# Allegro board 887904-1112.brd
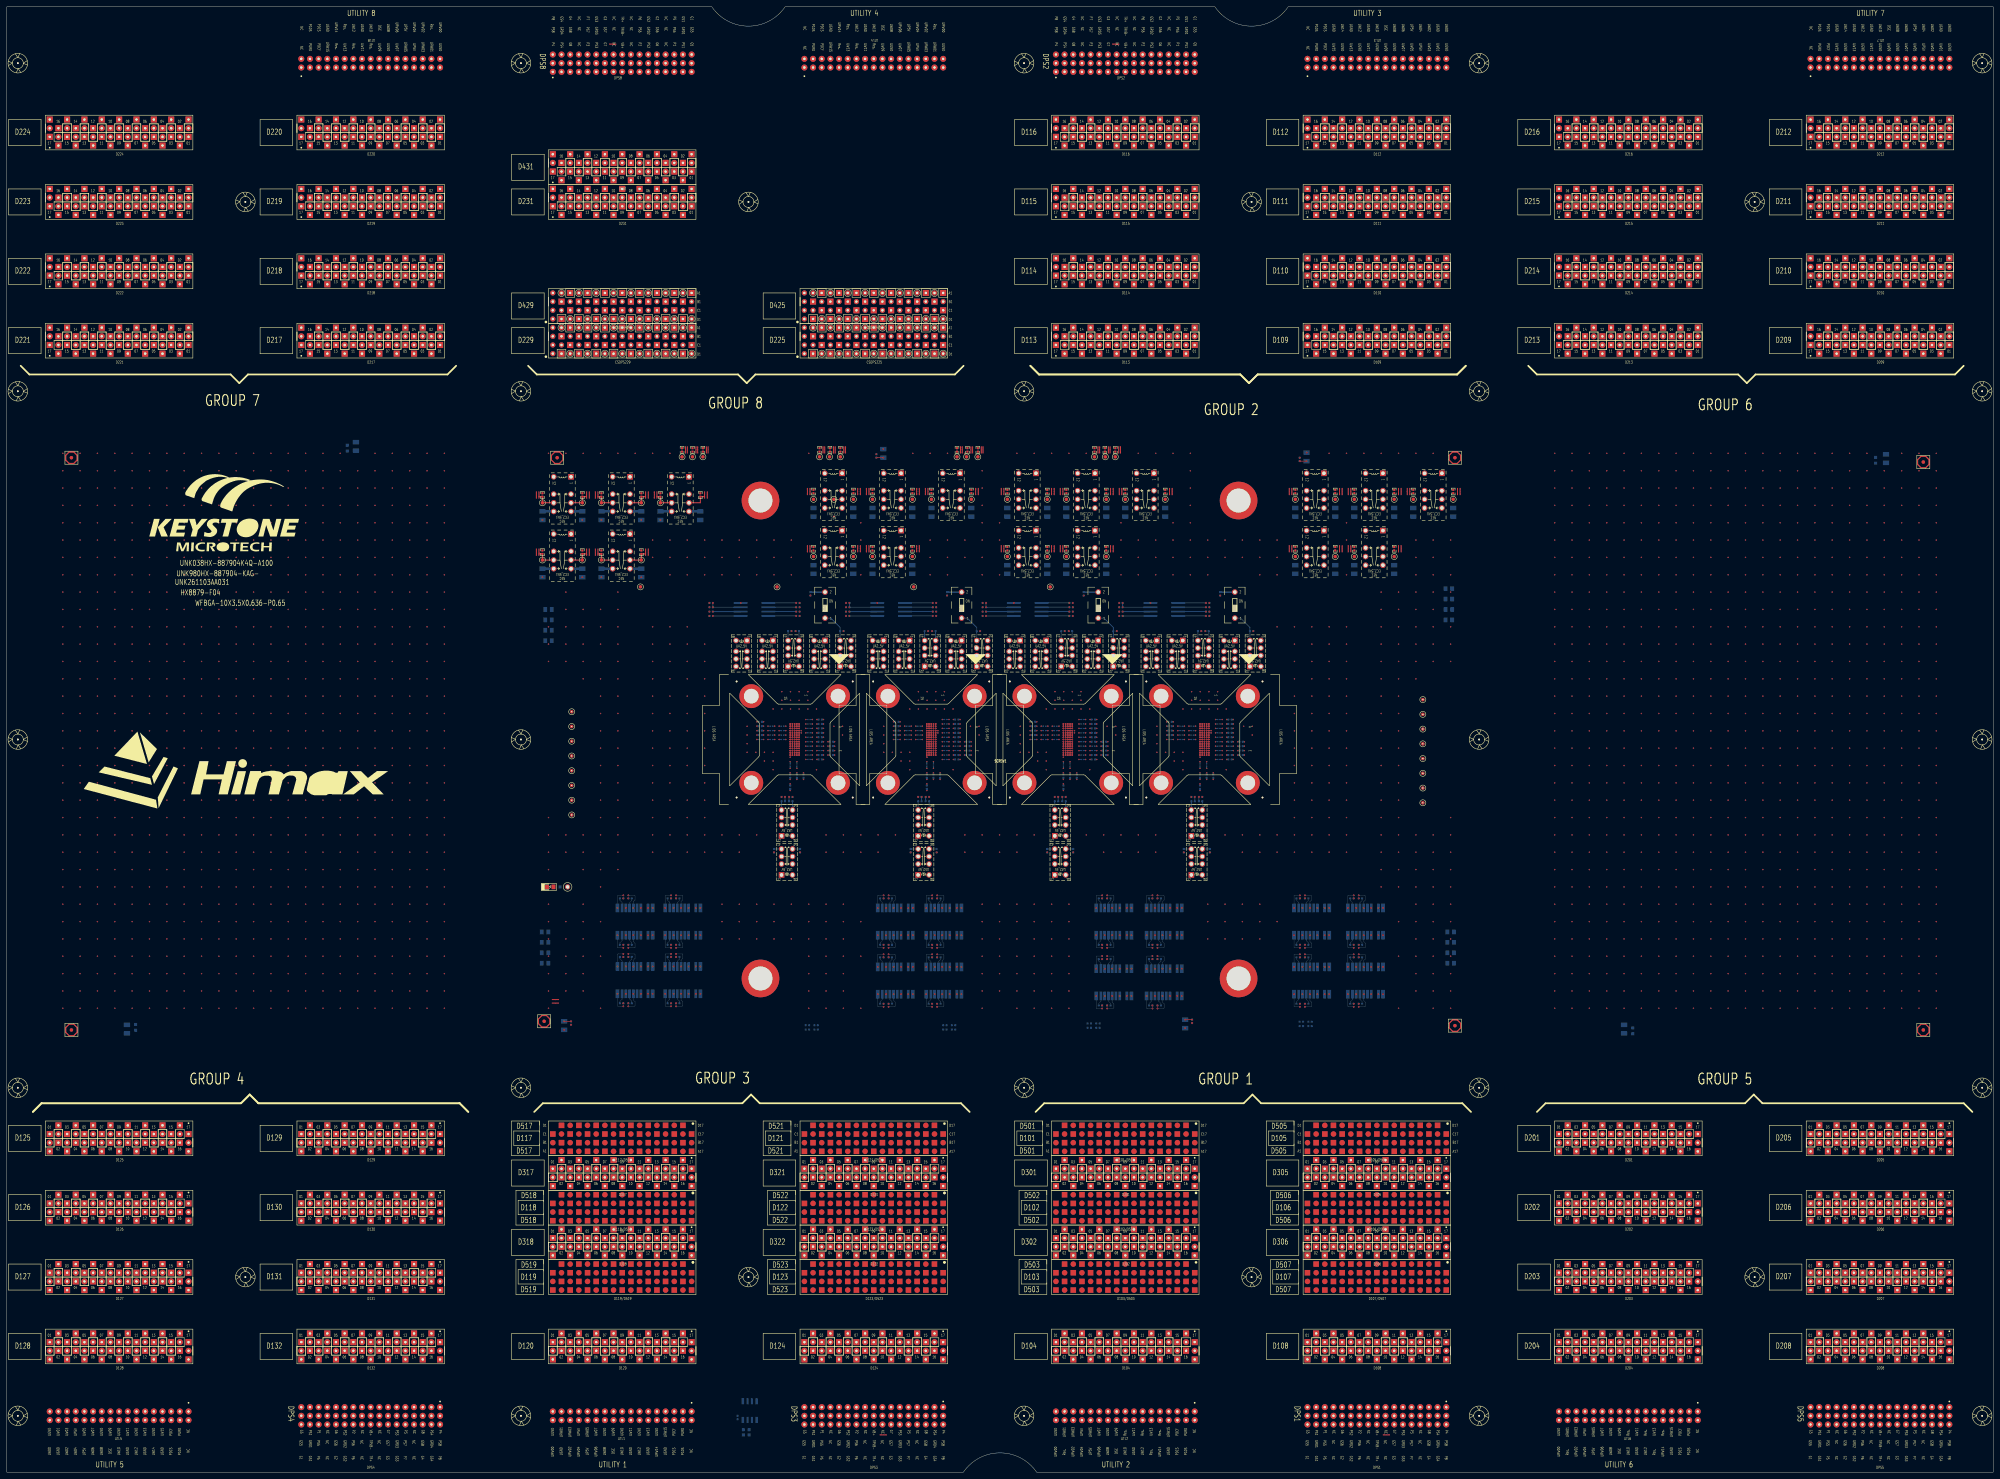
[diagram p0: board, top side]
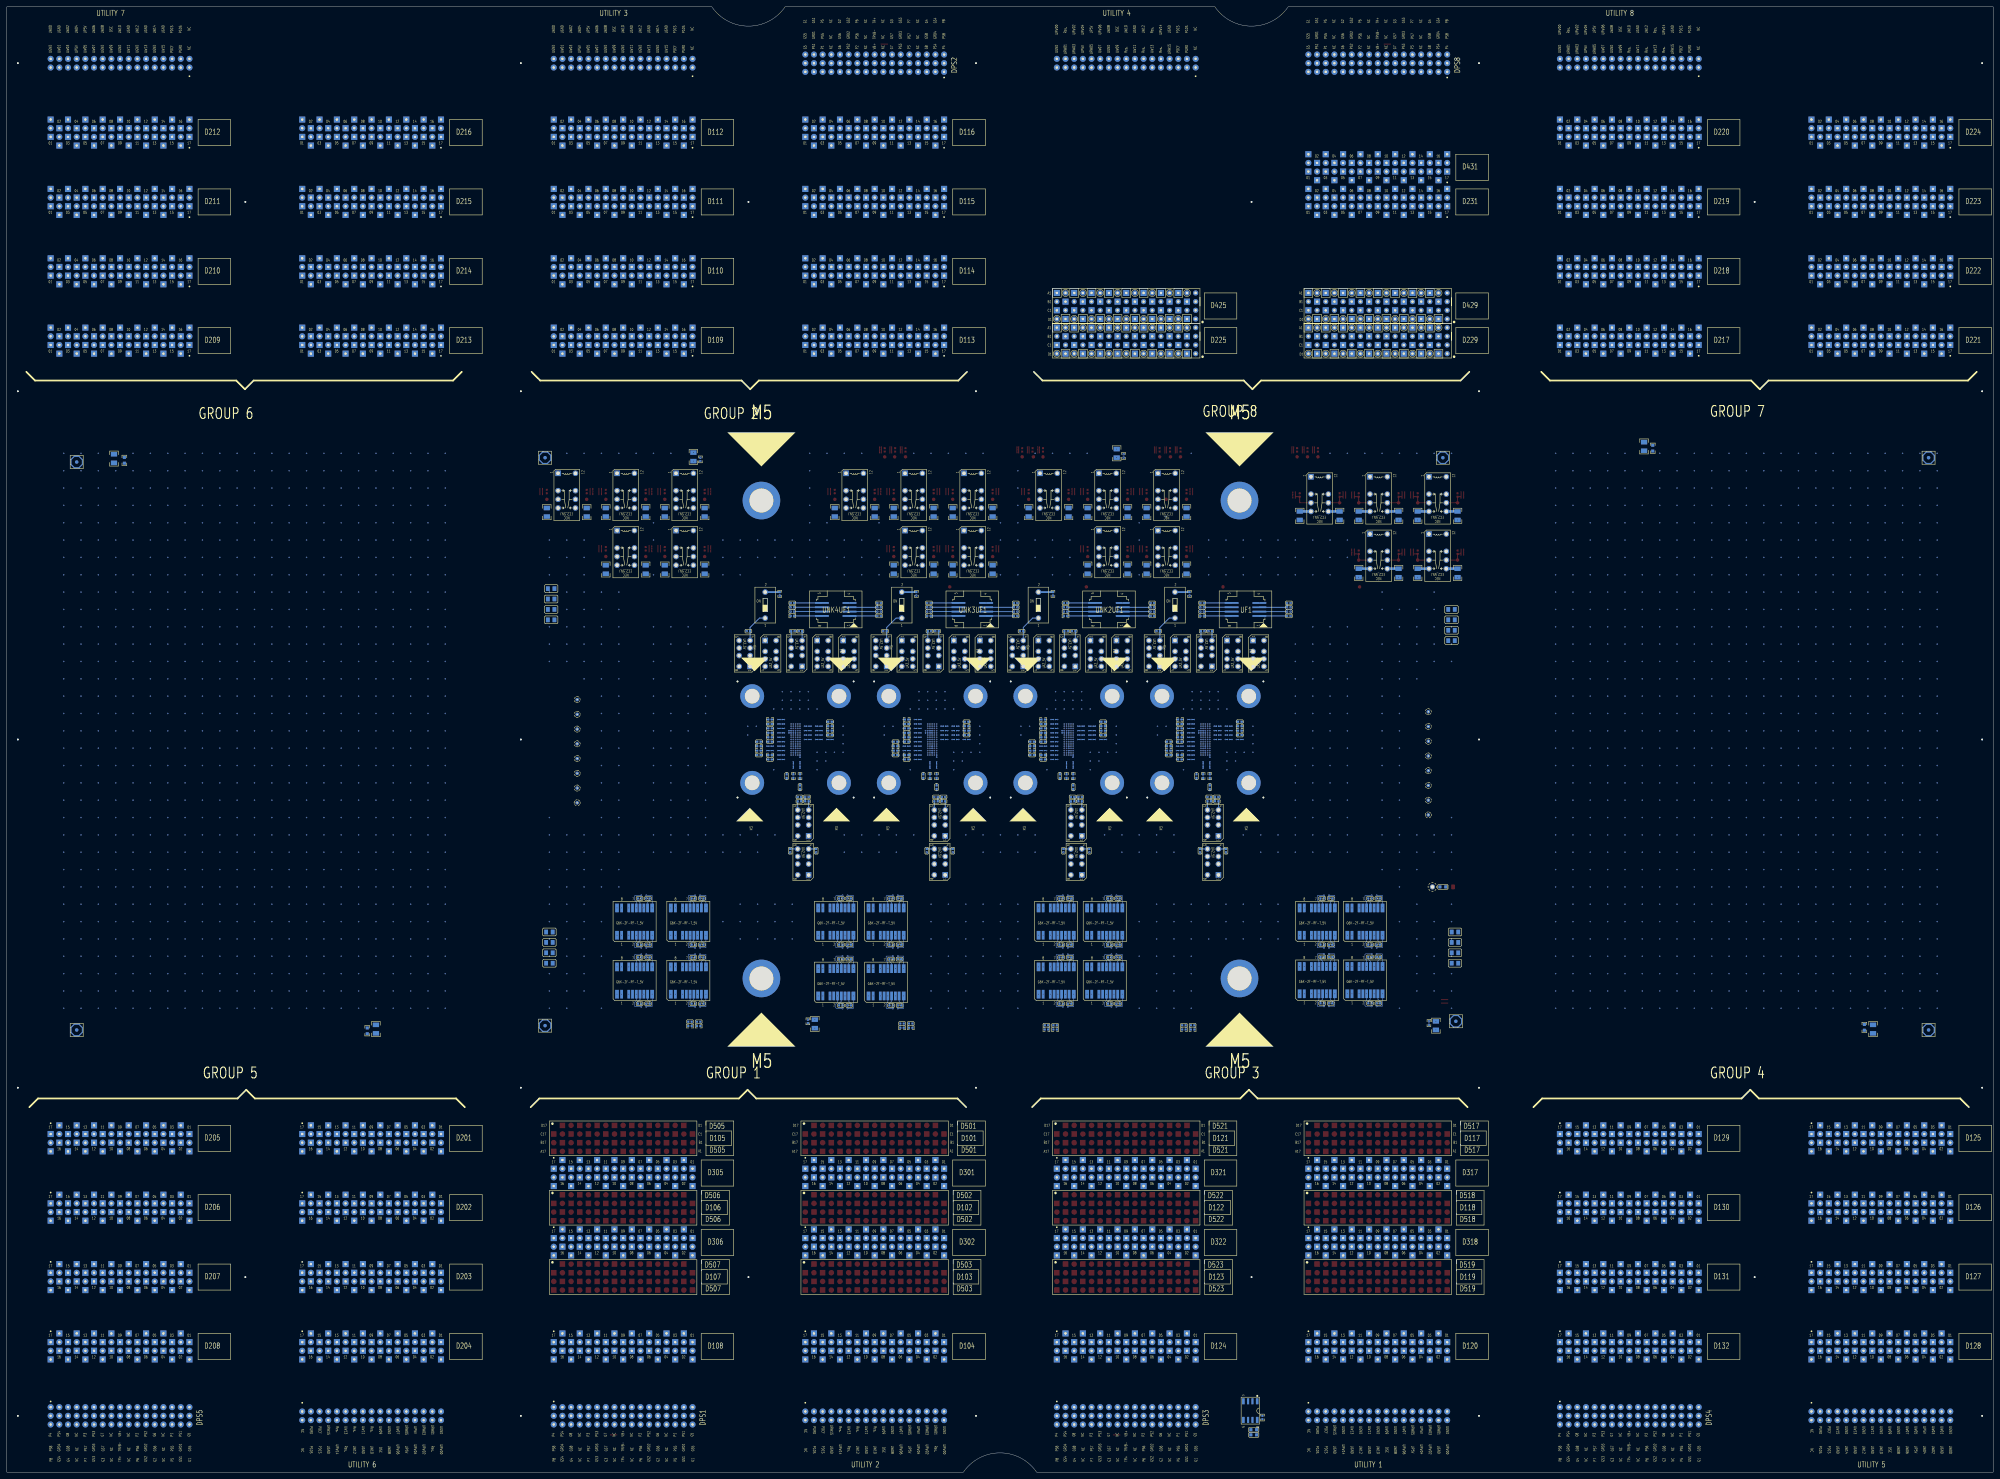
[diagram p1: board, bottom side, seen from below]

Outline 581.66 x 429.26 mm; copper layers: TOP, L02_GND, L03_SIGNAL, L04_GND, L05_SIGNAL, L06_GND, L07_SIGNAL, L08_GND, L09_POWER, L10_GND, L11_POWER, L12_GND, L13_POWER, L14_GND, L15_POWER, L16_GND, L17_POWER, L18_GND, L19_POWER, L20_GND, L21_POWER, L22_GND, L23_POWER, L24_GND, L25_5V, L26_CBIT, L27_GND, L28_SIGNAL, L29_GND, L30_SIGNAL, L31_GND, L32_SIGNAL, L33_GND, BOTTOM. Coordinates in mm from the lower left corner of the outline.

## Design rules (mm)
net group DIFFPAIR0: nets S1_AUX+ S1_AUX-

## Placement (name value [footprint] x y rotation side)
BD29  BD120-3A-S8  [FB0805]  157.6 149.1 180 bottom
BD30  BD120-3A-S8  [FB0805]  157.6 158.24 180 bottom
BD31  BD120-3A-S8  [FB0805]  157.6 155.19 180 bottom
BD32  BD120-3A-S8  [FB0805]  157.6 152.15 180 bottom
BD33  BD120-3A-S8  [FB0805]  422.78 158.24 180 bottom
BD34  BD120-3A-S8  [FB0805]  422.78 149.1 180 bottom
BD35  BD120-3A-S8  [FB0805]  422.78 152.15 180 bottom
BD36  BD120-3A-S8  [FB0805]  422.78 155.19 180 bottom
BD37  BD120-3A-S8  [FB0805]  158.62 252.73 180 bottom
BD38  BD120-3A-S8  [FB0805]  158.62 249.68 180 bottom
BD39  BD120-3A-S8  [FB0805]  158.62 246.63 180 bottom
BD40  BD120-3A-S8  [FB0805]  158.62 243.59 180 bottom
BD41  BD120-3A-S8  [FB0805]  422.27 249.68 180 bottom
BD42  BD120-3A-S8  [FB0805]  422.27 258.83 180 bottom
BD43  BD120-3A-S8  [FB0805]  422.27 255.78 180 bottom
BD44  BD120-3A-S8  [FB0805]  422.27 252.73 180 bottom
C1  0.1U-16-X-S4-MU  [C0402]  231.64 250.82 0 bottom
C53  0.1U-16-X-S4-MU  [C0402]  234.43 129.67 180 bottom
C54  0.1U-16-X-S4-MU  [C0402]  236.97 129.67 180 bottom
C55  0.1U-16-X-S4-MU  [C0402]  235.32 257.3 90 bottom
C67  1U-10-X-S4-MU  [C0402]  220.62 217.23 180 bottom
C69  10U-25-X7R-SA  [C1206]  168.52 263.42 270 bottom
C70  10U-25-X7R-SA  [C1206]  156.84 263.42 270 bottom
C71  1U-10-X-S4-MU  [C0402]  241.42 211.38 0 bottom
C73  1U-10-X-S4-MU  [C0402]  238.17 215.28 0 bottom
C75  1U-10-X-S4-MU  [C0402]  241.42 212.68 0 bottom
C77  1U-10-X-S4-MU  [C0402]  238.17 216.58 0 bottom
C79  1U-10-X-S4-MU  [C0402]  231.35 203.91 270 bottom
C81  1U-10-X-S4-MU  [C0402]  229.4 203.91 270 bottom
C83  1U-10-X-S4-MU  [C0402]  238.17 220.48 0 bottom
C85  1U-10-X-S4-MU  [C0402]  238.17 210.08 0 bottom
C87  1U-10-X-S4-MU  [C0402]  220.62 218.53 180 bottom
C89  10U-25-X7R-SA  [C1206]  185.79 280.18 270 bottom
C90  10U-25-X7R-SA  [C1206]  174.11 280.18 270 bottom
C91  10U-25-X7R-SA  [C1206]  203.07 280.18 270 bottom
C92  10U-25-X7R-SA  [C1206]  191.38 280.18 270 bottom
C93  10U-25-X7R-SA  [C1206]  168.52 280.18 270 bottom
C94  10U-25-X7R-SA  [C1206]  156.84 280.18 270 bottom
C95  10U-25-X7R-SA  [C1206]  185.79 263.42 270 bottom
C96  10U-25-X7R-SA  [C1206]  174.11 263.42 270 bottom
CA1  NC/2.2U-10-X-S4-MU  [C0402]  168.52 269.49 90 top
CA2  NC/2.2U-10-X-S4-MU  [C0402]  185.79 286.26 90 top
CA3  NC/2.2U-10-X-S4-MU  [C0402]  191.38 286.26 90 top
CA4  NC/2.2U-10-X-S4-MU  [C0402]  168.52 286.26 90 top
CA5  NC/2.2U-10-X-S4-MU  [C0402]  156.84 286.26 90 top
CA6  NC/2.2U-10-X-S4-MU  [C0402]  185.79 269.49 90 top
CA7  NC/2.2U-10-X-S4-MU  [C0402]  174.11 286.26 90 top
CA8  NC/2.2U-10-X-S4-MU  [C0402]  174.11 269.49 90 top
CA9  NC/2.2U-10-X-S4-MU  [C0402]  156.84 269.49 90 top
CA10  NC/2.2U-10-X-S4-MU  [C0402]  203.07 286.26 90 top
CA12  NC/2.2U-10-X-S4-MU  [C0402]  203.83 299.47 90 top
CA13  NC/2.2U-10-X-S4-MU  [C0402]  197.73 299.47 90 top
CA14  NC/2.2U-10-X-S4-MU  [C0402]  200.78 299.47 90 top
CB1  0.1U-16-X-S4-MU  [C0402]  165.22 131.56 270 bottom
CB2  10U-25-X7R-SA  [C1206]  163.19 130.81 90 bottom
CB3  0.1U-16-X-S4-MU  [C0402]  347.08 132.07 270 bottom
CB4  10U-25-X7R-SA  [C1206]  345.05 131.32 90 bottom
CB5  0.1U-16-X-S4-MU  [C0402]  378.58 296.68 90 bottom
CB6  10U-25-X7R-SA  [C1206]  380.61 297.43 270 bottom
CB7  0.1U-16-X-S4-MU  [C0402]  254.63 297.7 90 bottom
CB8  10U-25-X7R-SA  [C1206]  256.66 298.45 270 bottom
CB9  0.1U-25-X-S6  [C0603]  37.71 130.3 270 bottom
CB10  10U-25-X7R-SA  [C1206]  35.17 129.79 270 bottom
CB11  0.1U-25-X-S6  [C0603]  476.12 129.29 270 bottom
CB12  10U-25-X7R-SA  [C1206]  473.58 129.79 270 bottom
CB13  0.1U-25-X-S6  [C0603]  547.24 296.42 90 bottom
CB14  10U-25-X7R-SA  [C1206]  550.28 296.93 90 bottom
CB15  0.1U-25-X-S6  [C0603]  99.69 299.97 90 bottom
CB16  10U-25-X7R-SA  [C1206]  102.23 300.48 90 bottom
CB19  0.1U-16-X-S4-MU  [C0402]  213.99 16 90 bottom
CC1  0.47U-10-X6S-S2-TY  [C0201]  223.87 214.63 180 bottom
CC2  0.47U-10-X6S-S2-TY  [C0201]  223.87 215.93 180 bottom
CC3  0.47U-10-X6S-S2-TY  [C0201]  223.87 217.23 180 bottom
CC4  0.47U-10-X6S-S2-TY  [C0201]  220.62 214.63 180 bottom
CC5  0.47U-10-X6S-S2-TY  [C0201]  234.92 217.88 0 bottom
CC6  0.47U-10-X6S-S2-TY  [C0201]  238.17 211.38 0 bottom
CC7  0.47U-10-X6S-S2-TY  [C0201]  234.92 213.98 0 bottom
CC8  0.47U-10-X6S-S2-TY  [C0201]  234.92 215.28 0 bottom
CC9  0.47U-10-X6S-S2-TY  [C0201]  238.17 212.68 0 bottom
CC10  0.47U-10-X6S-S2-TY  [C0201]  234.92 216.58 0 bottom
CC11  0.47U-10-X6S-S2-TY  [C0201]  231.35 207.16 270 bottom
CC12  0.47U-10-X6S-S2-TY  [C0201]  229.4 207.16 270 bottom
CC13  0.47U-10-X6S-S2-TY  [C0201]  234.92 220.48 0 bottom
CC14  0.47U-10-X6S-S2-TY  [C0201]  234.92 208.78 0 bottom
CC15  0.47U-10-X6S-S2-TY  [C0201]  223.87 218.53 180 bottom
CD1  0.1U-10-X7R-S2-MU  [C0201]  227.12 215.93 180 bottom
CD2  0.1U-10-X7R-S2-MU  [C0201]  231.02 217.23 0 bottom
CD3  0.1U-10-X7R-S2-MU  [C0201]  227.12 217.23 180 bottom
CD4  0.1U-10-X7R-S2-MU  [C0201]  227.12 214.63 180 bottom
CD5  0.1U-10-X7R-S2-MU  [C0201]  230.7 212.35 270 bottom
CD6  0.1U-10-X7R-S2-MU  [C0201]  234.92 211.38 0 bottom
CD7  0.1U-10-X7R-S2-MU  [C0201]  231.02 216.58 0 bottom
CD8  0.1U-10-X7R-S2-MU  [C0201]  232.32 216.58 0 bottom
CD9  0.1U-10-X7R-S2-MU  [C0201]  234.92 212.68 0 bottom
CD10  0.1U-10-X7R-S2-MU  [C0201]  232.32 217.23 0 bottom
CD11  0.1U-10-X7R-S2-MU  [C0201]  230.7 211.06 90 bottom
CD12  0.1U-10-X7R-S2-MU  [C0201]  229.4 209.75 270 bottom
CD13  0.1U-10-X7R-S2-MU  [C0201]  234.92 219.18 0 bottom
CD14  0.1U-10-X7R-S2-MU  [C0201]  234.92 210.08 0 bottom
CD15  0.1U-10-X7R-S2-MU  [C0201]  227.12 218.53 180 bottom
CSDPS225  V93K_CSDPS_DPS32  [PG_VG93K_PF_DPS32_G8D225]  253.87 331.47 0 top
CSDPS229  V93K_CSDPS_DPS32  [PG_VG93K_PF_DPS32_G8D229]  180.21 331.47 0 top
CSDPS425  V93K_CSDPS_DPS32  [PG_VG93K_PF_DPS32_G8D425]  253.87 341.63 0 top
CSDPS429  V93K_CSDPS_DPS32  [PG_VG93K_PF_DPS32_G8D429]  180.21 341.63 0 top
D101/D501  V93K_PS1600 HD  [PG_VG93K_F_HSM_G1D101_501_ND]  327.53 97.79 0 top
D102/D502  V93K_PS1600 HD  [PG_VG93K_F_HSM_G1D102_502_ND]  327.53 77.47 0 top
D103/D503  V93K_PS1600 HD  [PG_VG93K_F_HSM_G1D103_503_ND]  327.53 57.15 0 top
D104  V93K_CH  [PG_VG93K_F_G1D104]  327.53 36.83 0 top
D105/D505  V93K_PS1600 HD  [PG_VG93K_F_HSM_G1D105_505_ND]  401.19 97.79 0 top
D106/D506  V93K_PS1600 HD  [PG_VG93K_F_HSM_G1D106_506_ND]  401.19 77.47 0 top
D107/D507  V93K_PS1600 HD  [PG_VG93K_F_HSM_G1D107_507_ND]  401.19 57.15 0 top
D108  V93K_CH  [PG_VG93K_F_G1D108]  401.19 36.83 0 top
D109  V93K_CH  [PG_VG93K_F_G2D109]  401.19 331.47 0 top
D110  V93K_CH  [PG_VG93K_F_G2D110]  401.19 351.79 0 top
D111  V93K_CH  [PG_VG93K_F_G2D111]  401.19 372.11 0 top
D112  V93K_CH  [PG_VG93K_F_G2D112]  401.19 392.43 0 top
D113  V93K_CH  [PG_VG93K_F_G2D113]  327.53 331.47 0 top
D114  V93K_CH  [PG_VG93K_F_G2D114]  327.53 351.79 0 top
D115  V93K_CH  [PG_VG93K_F_G2D115]  327.53 372.11 0 top
D116  V93K_CH  [PG_VG93K_F_G2D116]  327.53 392.43 0 top
D117/D517  V93K_PS1600 HD  [PG_VG93K_F_HSM_G3D117_517_ND]  180.21 97.79 0 top
D118/D518  V93K_PS1600 HD  [PG_VG93K_F_HSM_G3D118_518_ND]  180.21 77.47 0 top
D119/D519  V93K_PS1600 HD  [PG_VG93K_F_HSM_G3D119_519_ND]  180.21 57.15 0 top
D120  V93K_CH  [PG_VG93K_F_G3D120]  180.21 36.83 0 top
D121/D521  V93K_PS1600 HD  [PG_VG93K_F_HSM_G3D121_521_ND]  253.87 97.79 0 top
D122/D522  V93K_PS1600 HD  [PG_VG93K_F_HSM_G3D122_522_ND]  253.87 77.47 0 top
D123/D523  V93K_PS1600 HD  [PG_VG93K_F_HSM_G3D123_523_ND]  253.87 57.15 0 top
D124  V93K_CH  [PG_VG93K_F_G3D124]  253.87 36.83 0 top
D125  V93K_CH  [PG_VG93K_F_G4D125]  32.89 97.79 0 top
D126  V93K_CH  [PG_VG93K_F_G4D126]  32.89 77.47 0 top
D127  V93K_CH  [PG_VG93K_F_G4D127]  32.89 57.15 0 top
D128  V93K_CH  [PG_VG93K_F_G4D128]  32.89 36.83 0 top
D129  V93K_CH  [PG_VG93K_F_G4D129]  106.55 97.79 0 top
D130  V93K_CH  [PG_VG93K_F_G4D130]  106.55 77.47 0 top
D131  V93K_CH  [PG_VG93K_F_G4D131]  106.55 57.15 0 top
D132  V93K_CH  [PG_VG93K_F_G4D132]  106.55 36.83 0 top
D201  V93K_CH  [PG_VG93K_F_G5D201]  474.85 97.79 0 top
D202  V93K_CH  [PG_VG93K_F_G5D202]  474.85 77.47 0 top
D203  V93K_CH  [PG_VG93K_F_G5D203]  474.85 57.15 0 top
D204  V93K_CH  [PG_VG93K_F_G5D204]  474.85 36.83 0 top
D205  V93K_CH  [PG_VG93K_F_G5D205]  548.51 97.79 0 top
D206  V93K_CH  [PG_VG93K_F_G5D206]  548.51 77.47 0 top
D207  V93K_CH  [PG_VG93K_F_G5D207]  548.51 57.15 0 top
D208  V93K_CH  [PG_VG93K_F_G5D208]  548.51 36.83 0 top
D209  V93K_CH  [PG_VG93K_F_G6D209]  548.51 331.47 0 top
D210  V93K_CH  [PG_VG93K_F_G6D210]  548.51 351.79 0 top
D211  V93K_CH  [PG_VG93K_F_G6D211]  548.51 372.11 0 top
D212  V93K_CH  [PG_VG93K_F_G6D212]  548.51 392.43 0 top
D213  V93K_CH  [PG_VG93K_F_G6D213]  474.85 331.47 0 top
D214  V93K_CH  [PG_VG93K_F_G6D214]  474.85 351.79 0 top
D215  V93K_CH  [PG_VG93K_F_G6D215]  474.85 372.11 0 top
D216  V93K_CH  [PG_VG93K_F_G6D216]  474.85 392.43 0 top
D217  V93K_CH  [PG_VG93K_F_G7D217]  106.55 331.47 0 top
D218  V93K_CH  [PG_VG93K_F_G7D218]  106.55 351.79 0 top
D219  V93K_CH  [PG_VG93K_F_G7D219]  106.55 372.11 0 top
D220  V93K_CH  [PG_VG93K_F_G7D220]  106.55 392.43 0 top
D221  V93K_CH  [PG_VG93K_F_G7D221]  32.89 331.47 0 top
D222  V93K_CH  [PG_VG93K_F_G7D222]  32.89 351.79 0 top
D223  V93K_CH  [PG_VG93K_F_G7D223]  32.89 372.11 0 top
D224  V93K_CH  [PG_VG93K_F_G7D224]  32.89 392.43 0 top
D231  V93K_CH  [PG_VG93K_F_G8D231]  180.21 372.11 0 top
D301  V93K_CH  [PG_VG93K_F_G1D301]  327.53 87.63 0 top
D302  V93K_CH  [PG_VG93K_F_G1D302]  327.53 67.31 0 top
D305  V93K_CH  [PG_VG93K_F_G1D305]  401.19 87.63 0 top
D306  V93K_CH  [PG_VG93K_F_G1D306]  401.19 67.31 0 top
D317  V93K_CH  [PG_VG93K_F_G3D317]  180.21 87.63 0 top
D318  V93K_CH  [PG_VG93K_F_G3D318]  180.21 67.31 0 top
D321  V93K_CH  [PG_VG93K_F_G3D321]  253.87 87.63 0 top
D322  V93K_CH  [PG_VG93K_F_G3D322]  253.87 67.31 0 top
D431  V93K_CH  [PG_VG93K_F_G8D431]  180.21 382.27 0 top
DPS1  V93K_DPS  [PG_VG93K_F_G1DPS1]  401.19 16.51 0 top
DPS2  V93K_DPS  [PG_VG93K_F_G2DPS2]  327.53 412.75 0 top
DPS3  V93K_DPS  [PG_VG93K_F_G3DPS3]  253.87 16.51 0 top
DPS4  V93K_DPS  [PG_VG93K_F_G4DPS4]  106.55 16.51 0 top
DPS5  V93K_DPS  [PG_VG93K_F_G5DPS5]  548.51 16.51 0 top
DPS8  V93K_DPS  [PG_VG93K_F_G8DPS8]  180.21 412.75 0 top
FD1  -  [FD_040_V2]  157.35 132.08 0 top
FD2  -  [FD_040_V2]  424.05 130.81 0 top
FD3  -  [FD_040_V2]  424.05 297.18 0 top
FD4  -  [FD_040_V2]  161.16 297.18 0 top
FD5  -  [FD_040_V2]  18.92 129.54 0 top
FD6  -  [FD_040_V2]  561.21 129.54 0 top
FD7  -  [FD_040_V2]  561.21 295.91 0 top
FD8  -  [FD_040_V2]  18.92 297.18 0 top
FD9  -  [FD_040_V2]  157.35 132.08 180 bottom
FD10  -  [FD_040_V2]  424.05 130.81 180 bottom
FD11  -  [FD_040_V2]  424.05 297.18 180 bottom
FD12  -  [FD_040_V2]  161.16 297.18 180 bottom
FD13  -  [FD_040_V2]  18.92 129.54 180 bottom
FD14  -  [FD_040_V2]  561.21 129.54 180 bottom
FD15  -  [FD_040_V2]  561.21 295.91 180 bottom
FD16  -  [FD_040_V2]  18.92 297.18 180 bottom
GND1  TP01  [TP_040_T]  185.54 259.33 0 top
HX8879-F04  REF-CODE-CHIP  [CHIP_CODE]  56.51 257.81 0 top
K9  UA2-5NJ-A-V3  [RL_NECUA2_5V_V3]  228.47 189.99 270 bottom
K10  UA2-5NJ-A-V3  [RL_NECUA2_5V_V3]  245.61 239.63 270 bottom
K14  UA2-5NJ-A-V3  [RL_NECUA2_5V_V3]  215.13 240.03 90 bottom
K15  UA2-5NJ-A-V3  [RL_NECUA2_5V_V3]  222.75 240.03 90 bottom
K28  UA2-5NJ-A-V3  [RL_NECUA2_5V_V3]  230.37 239.63 270 bottom
K48  UA2-5NJ-A-V3  [RL_NECUA2_5V_V3]  237.99 240.03 90 bottom
K50  UA2-5NJ-A-V3  [RL_NECUA2_5V_V3]  228.47 178.56 270 bottom
K54  G6K-2F-RF-T-5V-SPECIAL  [RL_G6K2FRT_8P_5V_GR]  197.99 161.29 180 bottom
K55  EC2-5NJ-A  [RL_NECEC2_10P_5V]  162.68 268.48 90 bottom
K56  EC2-5NJ-A  [RL_NECEC2_10P_5V]  179.95 285.24 90 bottom
K57  EC2-5NJ-A  [RL_NECEC2_10P_5V]  197.22 285.24 90 bottom
K58  EC2-5NJ-A  [RL_NECEC2_10P_5V]  162.68 285.24 90 bottom
K59  EC2-5NJ-A  [RL_NECEC2_10P_5V]  179.95 268.48 90 bottom
K60  G6K-2F-RF-T-5V-SPECIAL  [RL_G6K2FRT_8P_5V_GR]  184.02 161.29 180 bottom
K61  G6K-2F-RF-T-5V-SPECIAL  [RL_G6K2FRT_8P_5V_GR]  184.02 144.14 180 bottom
K62  G6K-2F-RF-T-5V-SPECIAL  [RL_G6K2FRT_8P_5V_GR]  197.99 144.14 180 bottom
LDB1  LDB-2-S8  [LED_0805]  159.12 171.45 0 top
LOGO1  -  [LOGO_KT_KSMT]  60.57 274.07 0 top
LOGO2  LOGO_HX_Himax  [LOGO_HX_HIMAX]  65.65 200.41 0 top
LRB1  330-1-S6  [R0603]  161.16 171.45 180 bottom
NOREF  -  []  326.01 241.23 0 top
NOREF#2  -  []  275.52 213.66 90 top
NOREF#3  -  []  337.28 245.28 0 top
NOREF#4  -  []  392.68 140.02 90 top
NOREF#5  -  []  237.57 212.36 0 top
NOREF#6  -  []  333.74 256.53 0 top
NOREF#7  -  []  319.59 250.2 90 top
NOREF#8  -  []  475.67 130.14 0 top
NOREF#9  -  []  354.32 220.16 0 top
NOREF#10  -  []  304.35 243.63 0 top
NOREF#11  -  []  266.52 216.25 0 top
NOREF#12  -  []  278.77 212.36 90 top
NOREF#13  -  []  314.99 245.28 0 top
NOREF#14  -  []  197.44 140.15 0 top
NOREF#15  -  []  354.32 209.76 0 top
NOREF#16  -  []  239.59 243.63 0 top
NOREF#17  -  []  277.07 257.31 0 top
NOREF#18  -  []  300.95 241.63 0 top
NOREF#19  -  []  184.57 165.29 0 top
NOREF#20  -  []  237.07 257.31 0 top
NOREF#21  -  []  274.32 212.36 0 top
NOREF#22  -  []  266.67 191.59 0 top
NOREF#23  -  []  359.59 236.03 0 top
NOREF#24  -  []  236.59 248.76 90 top
NOREF#25  -  []  376.94 140.02 90 top
NOREF#26  -  []  322.61 245.28 0 top
NOREF#27  -  []  306.32 184.74 0 top
NOREF#28  -  []  177.67 167.19 0 top
NOREF#29  -  []  260.7 217.09 90 top
NOREF#30  -  []  339.51 165.29 0 top
NOREF#31  -  []  233.97 238.03 90 top
NOREF#32  -  []  317.87 149.41 0 top
NOREF#33  -  []  346.64 247.33 90 top
NOREF#34  -  []  203.61 139.69 90 top
NOREF#35  -  []  226.37 241.23 0 top
NOREF#36  -  []  201.74 157.29 0 top
NOREF#37  -  []  397.33 157.29 0 top
NOREF#38  -  []  306.52 218.21 90 top
NOREF#39  -  []  182.37 148.14 0 top
NOREF#40  -  []  310.7 210.76 90 top
NOREF#41  -  []  315.52 220.16 90 top
NOREF#42  -  []  333.76 139.51 90 top
NOREF#43  -  []  288.7 233.63 0 top
NOREF#44  -  []  313.97 238.03 90 top
NOREF#45  -  []  234.62 215.28 0 top
NOREF#46  -  []  197.44 157.29 0 top
NOREF#47  -  []  233.99 241.63 0 top
NOREF#48  -  []  331.13 241.63 0 top
NOREF#49  -  []  251.7 233.63 0 top
NOREF#50  -  []  317.87 211.38 0 top
NOREF#51  -  []  234.32 213.66 0 top
NOREF#52  -  []  311.14 196.91 90 top
NOREF#53  -  []  347.37 245.28 0 top
NOREF#54  -  []  300.02 214.95 0 top
NOREF#55  -  []  235.52 208.46 90 top
NOREF#56  -  []  300.32 214.63 0 top
NOREF#57  -  []  346.52 218.85 0 top
NOREF#58  -  []  273.89 140.02 0 top
NOREF#59  -  []  226.82 215.93 0 top
NOREF#60  -  []  316.59 259.26 0 top
NOREF#61  -  []  258.75 241.63 0 top
NOREF#62  -  []  367.7 197.63 90 top
NOREF#63  -  []  234.32 208.46 0 top
NOREF#64  -  []  224.47 191.59 0 top
NOREF#65  -  []  283.4 201.93 90 top
NOREF#66  -  []  211.13 241.63 0 top
NOREF#67  -  []  262.99 250.83 90 top
NOREF#68  -  []  264.47 191.59 0 top
NOREF#69  -  []  216.73 236.03 0 top
NOREF#70  -  []  303.57 215.93 0 top
NOREF#71  -  []  231.62 216.26 90 top
NOREF#72  -  []  218.73 238.43 90 top
NOREF#73  -  []  274.32 218.86 0 top
NOREF#74  -  []  269.08 209.16 90 top
NOREF#75  -  []  223.27 215.61 90 top
NOREF#76  -  []  352 210.08 90 top
NOREF#77  -  []  362.61 234.38 0 top
NOREF#78  -  []  275.52 208.46 90 top
NOREF#79  -  []  312.07 176.96 90 top
NOREF#80  -  []  255.02 157.29 90 top
NOREF#81  -  []  322.57 165.29 0 top
NOREF#82  -  []  247.7 197.63 90 top
NOREF#83  -  []  296.73 236.03 0 top
NOREF#84  -  []  305.47 173.31 0 top
NOREF#85  -  []  386.24 157.34 90 top
NOREF#86  -  []  316.59 248.76 90 top
NOREF#87  -  []  223.57 215.93 0 top
NOREF#88  -  []  298 227.33 0 top
NOREF#89  -  []  354.32 213.66 0 top
NOREF#90  -  []  357.07 250.71 90 top
NOREF#91  -  []  251.7 228.68 45 top
NOREF#92  -  []  270.59 165.29 0 top
NOREF#93  -  []  398.43 148.02 0 top
NOREF#94  -  []  192.34 158.56 90 top
NOREF#95  -  []  229.4 219.18 0 top
NOREF#96  -  []  274.62 208.78 0 top
NOREF#97  -  []  191.64 150.04 0 top
NOREF#98  -  []  273.97 238.03 90 top
NOREF#99  -  []  234.62 211.38 0 top
NOREF#100  -  []  249.21 238.03 90 top
NOREF#101  -  []  314.32 213.66 0 top
NOREF#102  -  []  266.32 184.74 0 top
NOREF#103  -  []  360.14 245.28 0 top
NOREF#104  -  []  226.32 173.31 0 top
NOREF#105  -  []  269.08 209.16 0 top
NOREF#106  -  []  397.33 140.02 0 top
NOREF#107  -  []  269.66 140.57 90 top
NOREF#108  -  []  223.27 214.95 0 top
NOREF#109  -  []  226.52 218.85 0 top
NOREF#110  -  []  346.32 173.31 0 top
NOREF#111  -  []  343.06 157.34 90 top
NOREF#112  -  []  303.27 216.25 0 top
NOREF#113  -  []  317.57 211.06 0 top
NOREF#114  -  []  271.03 206.56 0 top
NOREF#115  -  []  398.43 148.02 0 top
NOREF#116  -  []  333.76 165.29 0 top
NOREF#117  -  []  256.37 165.29 0 top
NOREF#118  -  []  352.92 216.91 90 top
NOREF#119  -  []  178.82 140.15 90 top
NOREF#120  -  []  392.68 165.29 0 top
NOREF#121  -  []  192.79 140.15 90 top
NOREF#122  -  []  306.32 173.31 0 top
NOREF#123  -  []  361.61 241.23 0 top
NOREF#124  -  []  281.59 238.43 90 top
NOREF#125  -  []  319.02 165.29 0 top
NOREF#126  -  []  354.62 220.48 0 top
NOREF#127  -  []  293.33 241.63 0 top
NOREF#128  -  []  311.72 216.26 0 top
NOREF#129  -  []  315.52 208.46 90 top
NOREF#130  -  []  358.77 212.36 90 top
NOREF#131  -  []  253.87 167.19 0 top
NOREF#132  -  []  336.21 157.29 0 top
NOREF#133  -  []  304.64 249.73 90 top
NOREF#134  -  []  274.99 245.28 0 top
NOREF#135  -  []  354.32 217.56 0 top
NOREF#136  -  []  252.7 195.63 90 top
NOREF#137  -  []  323.81 241.23 0 top
NOREF#138  -  []  158.02 172.18 0 top
NOREF#139  -  []  310.38 211.66 0 top
NOREF#140  -  []  310.7 212.05 90 top
NOREF#141  -  []  211.7 228.68 45 top
NOREF#142  -  []  203.7 204.63 90 top
NOREF#143  -  []  202.09 157.34 90 top
NOREF#144  -  []  268.87 191.59 0 top
NOREF#145  -  []  264.47 180.16 0 top
NOREF#146  -  []  354.62 216.58 0 top
NOREF#147  -  []  315.52 213.66 90 top
NOREF#148  -  []  271.69 140.02 0 top
NOREF#149  -  []  259.67 157.29 0 top
NOREF#150  -  []  143.7 321.13 0 top
NOREF#151  -  []  229.4 206.86 90 top
NOREF#152  -  []  412.53 273.64 0 top
NOREF#153  -  []  234.32 216.26 0 top
NOREF#154  -  []  234.32 211.06 0 top
NOREF#155  -  []  317.07 250.71 90 top
NOREF#156  -  []  321.47 157.29 0 top
NOREF#157  -  []  355.52 220.16 90 top
NOREF#158  -  []  241.59 238.43 90 top
NOREF#159  -  []  269.4 219.18 0 top
NOREF#160  -  []  315.52 209.76 90 top
NOREF#161  -  []  315.72 204.55 0 top
NOREF#162  -  []  403.51 156.84 90 top
NOREF#163  -  []  234.32 214.96 0 top
NOREF#164  -  []  312.92 216.26 90 top
NOREF#165  -  []  223.27 218.21 90 top
NOREF#166  -  []  179.24 157.84 90 top
NOREF#167  -  []  243.7 204.63 90 top
NOREF#168  -  []  182.37 165.29 0 top
NOREF#169  -  []  232.02 217.23 0 top
NOREF#170  -  []  280.06 139.57 90 top
NOREF#171  -  []  277.57 212.36 0 top
NOREF#172  -  []  272.07 188.39 90 top
NOREF#173  -  []  236.59 259.26 0 top
NOREF#174  -  []  291.13 241.63 0 top
NOREF#175  -  []  240.14 245.28 0 top
NOREF#176  -  []  267.37 245.28 0 top
NOREF#177  -  []  264.14 248.93 90 top
NOREF#178  -  []  160.92 170.45 90 top
NOREF#179  -  []  293.24 255.73 0 top
NOREF#180  -  []  234.32 212.36 0 top
NOREF#181  -  []  333.31 140.78 90 top
NOREF#182  -  []  223.27 217.55 0 top
NOREF#183  -  []  306.67 191.59 0 top
NOREF#184  -  []  269.08 206.56 0 top
NOREF#185  -  []  343.27 218.21 90 top
NOREF#186  -  []  260.77 148.02 0 top
NOREF#187  -  []  309.08 209.16 0 top
NOREF#188  -  []  263.57 215.93 0 top
NOREF#189  -  []  226.52 218.21 90 top
NOREF#190  -  []  257.47 157.29 0 top
NOREF#191  -  []  324.77 147.51 0 top
NOREF#192  -  []  274.62 213.98 0 top
NOREF#193  -  []  354.32 216.26 0 top
NOREF#194  -  []  343.27 216.91 90 top
NOREF#195  -  []  366.01 241.23 0 top
NOREF#196  -  []  258.73 238.43 90 top
NOREF#197  -  []  357.57 212.36 0 top
NOREF#198  -  []  318.77 212.36 90 top
NOREF#199  -  []  268.79 141.29 90 top
NOREF#200  -  []  354.62 211.38 0 top
NOREF#201  -  []  345.47 195.64 0 top
NOREF#202  -  []  278.39 241.63 0 top
NOREF#203  -  []  314.32 216.26 0 top
NOREF#204  -  []  269.4 209.46 90 top
NOREF#205  -  []  346.67 180.16 0 top
NOREF#206  -  []  401.63 140.02 0 top
NOREF#207  -  []  283.7 224.63 0 top
NOREF#208  -  []  258.75 241.63 0 top
NOREF#209  -  []  322.57 147.51 0 top
NOREF#210  -  []  328.32 157.34 90 top
NOREF#211  -  []  274.99 165.29 0 top
NOREF#212  -  []  181.27 157.29 0 top
NOREF#213  -  []  232 210.08 90 top
NOREF#214  -  []  272.02 217.23 0 top
NOREF#215  -  []  260.02 214.31 90 top
NOREF#216  -  []  310.72 216.58 0 top
NOREF#217  -  []  226.52 217.55 0 top
NOREF#218  -  []  332.61 137.61 90 top
NOREF#219  -  []  323.4 201.93 90 top
NOREF#220  -  []  274.62 210.08 0 top
NOREF#221  -  []  253.87 138.12 90 top
NOREF#222  -  []  232.07 188.39 90 top
NOREF#223  -  []  355.52 214.96 90 top
NOREF#224  -  []  334.89 250.82 90 top
NOREF#225  -  []  272.02 216.58 0 top
NOREF#226  -  []  348.87 180.16 0 top
NOREF#227  -  []  349.08 209.16 0 top
NOREF#228  -  []  198.54 165.29 0 top
NOREF#229  -  []  329.21 238.03 90 top
NOREF#230  -  []  277.07 250.71 90 top
NOREF#231  -  []  224.64 249.73 90 top
NOREF#232  -  []  178.82 165.29 0 top
NOREF#233  -  []  225.47 195.64 0 top
NOREF#234  -  []  347.37 234.38 0 top
NOREF#235  -  []  229.08 209.16 90 top
NOREF#236  -  []  303.27 218.21 90 top
NOREF#237  -  []  303.57 218.53 0 top
NOREF#238  -  []  271.02 210.46 90 top
NOREF#239  -  []  234.62 210.08 0 top
NOREF#240  -  []  318.58 140.78 90 top
NOREF#241  -  []  242.61 245.28 0 top
NOREF#242  -  []  361.61 241.23 0 top
NOREF#243  -  []  266.52 216.91 90 top
NOREF#244  -  []  271.72 216.26 0 top
NOREF#245  -  []  357.57 211.06 0 top
NOREF#246  -  []  313.99 241.63 0 top
NOREF#247  -  []  274.32 214.96 0 top
NOREF#248  -  []  274.32 209.76 0 top
NOREF#249  -  []  253.24 255.73 0 top
NOREF#250  -  []  377.36 140.57 90 top
NOREF#251  -  []  268.22 234.38 0 top
NOREF#252  -  []  306.52 218.85 0 top
NOREF#253  -  []  304.9 245.28 0 top
NOREF#254  -  []  311.02 210.46 90 top
NOREF#255  -  []  303.57 214.63 0 top
NOREF#256  -  []  275.52 218.86 90 top
NOREF#257  -  []  346.52 216.25 0 top
NOREF#258  -  []  323.7 224.63 0 top
NOREF#259  -  []  241.61 241.23 0 top
NOREF#260  -  []  351.62 216.91 90 top
NOREF#261  -  []  298.73 238.43 90 top
NOREF#262  -  []  322.61 245.28 0 top
NOREF#263  -  []  227.37 234.38 0 top
NOREF#264  -  []  235.52 214.96 90 top
NOREF#265  -  []  220.02 214.95 0 top
NOREF#266  -  []  291.13 241.63 0 top
NOREF#267  -  []  319.02 139.51 90 top
NOREF#268  -  []  220.02 214.31 90 top
NOREF#269  -  []  259.75 245.28 0 top
NOREF#270  -  []  345.47 184.21 0 top
NOREF#271  -  []  272.79 148.02 0 top
NOREF#272  -  []  235.52 211.06 90 top
NOREF#273  -  []  231.35 206.86 90 top
NOREF#274  -  []  231.03 206.56 90 top
NOREF#275  -  []  234.99 245.28 0 top
NOREF#276  -  []  271.72 216.91 0 top
NOREF#277  -  []  223.57 218.53 0 top
NOREF#278  -  []  271.62 216.26 90 top
NOREF#279  -  []  343.27 214.31 90 top
NOREF#280  -  []  263.57 214.63 0 top
NOREF#281  -  []  350.38 211.66 0 top
NOREF#282  -  []  256.37 148.02 0 top
NOREF#283  -  []  257.28 245.28 0 top
NOREF#284  -  []  346.37 241.23 0 top
NOREF#285  -  []  380.49 165.29 0 top
NOREF#286  -  []  314.62 219.18 0 top
NOREF#287  -  []  391.53 155.39 90 top
NOREF#288  -  []  303.57 217.23 0 top
NOREF#289  -  []  260.77 165.29 0 top
NOREF#290  -  []  280.14 245.28 0 top
NOREF#291  -  []  192.34 141.42 90 top
NOREF#292  -  []  223.57 217.23 0 top
NOREF#293  -  []  349.4 206.86 90 top
NOREF#294  -  []  345.47 184.74 0 top
NOREF#295  -  []  266.37 241.23 0 top
NOREF#296  -  []  303.27 218.85 0 top
NOREF#297  -  []  292.7 195.63 90 top
NOREF#298  -  []  275.52 214.96 90 top
NOREF#299  -  []  269.24 148.02 0 top
NOREF#300  -  []  178.37 158.56 90 top
NOREF#301  -  []  347.37 245.28 0 top
NOREF#302  -  []  263.57 218.53 0 top
NOREF#303  -  []  226.82 214.63 0 top
NOREF#304  -  []  348.87 191.59 0 top
NOREF#305  -  []  232.02 216.58 0 top
NOREF#306  -  []  311.62 216.26 90 top
NOREF#307  -  []  286.01 241.23 0 top
NOREF#308  -  []  354.62 219.18 0 top
NOREF#309  -  []  234.62 220.48 0 top
NOREF#310  -  []  314.62 216.58 0 top
NOREF#311  -  []  300.02 214.31 90 top
NOREF#312  -  []  270.72 216.58 0 top
NOREF#313  -  []  255.02 148.02 0 top
NOREF#314  -  []  291.7 228.68 45 top
NOREF#315  -  []  344.35 243.63 0 top
NOREF#316  -  []  342.71 139.51 0 top
NOREF#317  -  []  319.02 147.51 0 top
NOREF#318  -  []  99.24 299.12 0 top
NOREF#319  -  []  333.7 231.63 0 top
NOREF#320  -  []  260.77 148.02 0 top
NOREF#321  -  []  306.64 247.33 90 top
NOREF#322  -  []  211.7 233.63 0 top
NOREF#323  -  []  431.7 114.13 90 top
NOREF#324  -  []  354.32 212.36 0 top
NOREF#325  -  []  228.87 180.16 0 top
NOREF#326  -  []  355.52 212.36 90 top
NOREF#327  -  []  188.12 157.34 90 top
NOREF#328  -  []  339.75 245.28 0 top
NOREF#329  -  []  315.52 216.26 90 top
NOREF#330  -  []  398.43 165.29 0 top
NOREF#331  -  []  307.37 234.38 0 top
NOREF#332  -  []  351.62 216.26 90 top
NOREF#333  -  []  293.74 256.53 0 top
NOREF#334  -  []  304.47 180.16 0 top
NOREF#335  -  []  343.57 214.63 0 top
NOREF#336  -  []  264.32 157.34 90 top
NOREF#337  -  []  266.32 173.31 0 top
NOREF#338  -  []  303.27 214.95 0 top
NOREF#339  -  []  251.24 258.13 0 top
NOREF#340  -  []  323.67 157.29 0 top
NOREF#341  -  []  317.87 155.39 90 top
NOREF#342  -  []  270.77 241.23 0 top
NOREF#343  -  []  192.79 165.29 0 top
NOREF#344  -  []  272 210.08 90 top
NOREF#345  -  []  335.11 147.51 0 top
NOREF#346  -  []  332.61 149.41 0 top
NOREF#347  -  []  376.49 141.29 90 top
NOREF#348  -  []  346.32 184.74 0 top
NOREF#349  -  []  212.13 245.28 0 top
NOREF#350  -  []  336.21 139.51 0 top
NOREF#351  -  []  308.87 180.16 0 top
NOREF#352  -  []  263.15 241.63 0 top
NOREF#353  -  []  237.87 211.38 0 top
NOREF#354  -  []  243.7 224.63 0 top
NOREF#355  -  []  346.82 217.23 0 top
NOREF#356  -  []  320.37 165.29 0 top
NOREF#357  -  []  279.59 250.2 90 top
NOREF#358  -  []  319.02 157.29 90 top
NOREF#359  -  []  376.94 148.02 0 top
NOREF#360  -  []  257.47 140.02 0 top
NOREF#361  -  []  264.47 191.59 0 top
NOREF#362  -  []  237.57 211.06 0 top
NOREF#363  -  []  156.49 172.45 0 top
NOREF#364  -  []  314.32 217.56 0 top
NOREF#365  -  []  394.03 148.02 0 top
NOREF#366  -  []  265.47 184.21 0 top
NOREF#367  -  []  312.07 188.39 90 top
NOREF#368  -  []  329.85 139.06 90 top
NOREF#369  -  []  274.62 217.88 0 top
NOREF#370  -  []  265.47 184.21 0 top
NOREF#371  -  []  362.61 245.28 0 top
NOREF#372  -  []  380.49 148.02 0 top
NOREF#373  -  []  328.32 139.56 90 top
NOREF#374  -  []  308.57 241.23 0 top
NOREF#375  -  []  345.47 184.21 0 top
NOREF#376  -  []  307.37 245.28 0 top
NOREF#377  -  []  239.59 236.03 0 top
NOREF#378  -  []  310.38 211.75 0 top
NOREF#379  -  []  225.47 173.31 0 top
NOREF#380  -  []  348.57 241.23 0 top
NOREF#381  -  []  339.51 147.51 0 top
NOREF#382  -  []  211.24 258.13 0 top
NOREF#383  -  []  332.13 245.28 0 top
NOREF#384  -  []  314.62 212.68 0 top
NOREF#385  -  []  306.37 241.23 0 top
NOREF#386  -  []  265.47 195.64 0 top
NOREF#387  -  []  324.77 165.29 0 top
NOREF#388  -  []  278.19 157.29 0 top
NOREF#389  -  []  345.47 195.64 0 top
NOREF#390  -  []  223.57 214.63 0 top
NOREF#391  -  []  298.75 241.63 0 top
NOREF#392  -  []  352.07 176.96 90 top
NOREF#393  -  []  312.02 216.58 0 top
NOREF#394  -  []  312.92 216.91 90 top
NOREF#395  -  []  214.89 250.82 90 top
NOREF#396  -  []  218.75 241.63 0 top
NOREF#397  -  []  338.73 238.43 90 top
NOREF#398  -  []  194.14 148.14 0 top
NOREF#399  -  []  226.64 247.33 90 top
NOREF#400  -  []  231.72 216.26 0 top
NOREF#401  -  []  348.2 279.63 90 top
NOREF#402  -  []  276.59 259.26 0 top
NOREF#403  -  []  234.32 217.56 0 top
NOREF#404  -  []  263.27 217.55 0 top
NOREF#405  -  []  266.52 218.21 90 top
NOREF#406  -  []  348.2 279.63 0 top
NOREF#407  -  []  232.92 216.26 90 top
NOREF#408  -  []  382.69 165.29 0 top
NOREF#409  -  []  309.4 219.18 0 top
NOREF#410  -  []  213.33 241.63 0 top
NOREF#411  -  []  266.52 214.95 0 top
NOREF#412  -  []  187.77 140.15 0 top
NOREF#413  -  []  314.32 209.76 0 top
NOREF#414  -  []  231.02 210.46 90 top
NOREF#415  -  []  183.47 157.29 0 top
NOREF#416  -  []  303.27 217.55 0 top
NOREF#417  -  []  275.72 204.55 0 top
NOREF#418  -  []  333.33 241.63 0 top
NOREF#419  -  []  354.62 213.98 0 top
NOREF#420  -  []  238.39 241.63 0 top
NOREF#421  -  []  196.34 165.29 0 top
NOREF#422  -  []  226.82 217.23 0 top
NOREF#423  -  []  381.59 157.29 0 top
NOREF#424  -  []  271.03 206.56 90 top
NOREF#425  -  []  331.13 241.63 0 top
NOREF#426  -  []  354.62 217.88 0 top
NOREF#427  -  []  234.32 209.76 0 top
NOREF#428  -  []  226.52 214.31 90 top
NOREF#429  -  []  385.89 157.29 0 top
NOREF#430  -  []  401.63 157.29 0 top
NOREF#431  -  []  311.62 216.91 90 top
NOREF#432  -  []  306.52 216.91 90 top
NOREF#433  -  []  269.24 157.29 90 top
NOREF#434  -  []  309.4 206.86 90 top
NOREF#435  -  []  227.37 245.28 0 top
NOREF#436  -  []  315.52 218.86 90 top
NOREF#437  -  []  270.59 148.02 0 top
NOREF#438  -  []  338 227.33 0 top
NOREF#439  -  []  263.97 157.29 0 top
NOREF#440  -  []  318.39 241.63 0 top
NOREF#441  -  []  305.47 195.64 0 top
NOREF#442  -  []  268.57 241.23 0 top
NOREF#443  -  []  280.06 156.84 90 top
NOREF#444  -  []  315.52 217.56 90 top
NOREF#445  -  []  358.77 211.06 90 top
NOREF#446  -  []  279.59 236.03 0 top
NOREF#447  -  []  224.9 245.28 0 top
NOREF#448  -  []  320.14 245.28 0 top
NOREF#449  -  []  310.77 241.23 0 top
NOREF#450  -  []  273.99 241.63 0 top
NOREF#451  -  []  274.32 220.16 0 top
NOREF#452  -  []  355.52 213.66 90 top
NOREF#453  -  []  191.64 155.39 90 top
NOREF#454  -  []  274.62 219.18 0 top
NOREF#455  -  []  37.26 131.15 0 top
NOREF#456  -  []  292.13 245.28 0 top
NOREF#457  -  []  264.35 243.63 0 top
NOREF#458  -  []  243.4 201.93 90 top
NOREF#459  -  []  356.59 248.76 90 top
NOREF#460  -  []  260.32 214.63 0 top
NOREF#461  -  []  267.37 245.28 0 top
NOREF#462  -  []  375.79 149.92 0 top
NOREF#463  -  []  376.94 165.29 0 top
NOREF#464  -  []  314.62 220.48 0 top
NOREF#465  -  []  252.13 245.28 0 top
NOREF#466  -  []  178.82 157.29 90 top
NOREF#467  -  []  192.79 157.29 90 top
NOREF#468  -  []  263.27 214.31 90 top
NOREF#469  -  []  393.11 140.57 90 top
NOREF#470  -  []  265.47 184.74 0 top
NOREF#471  -  []  266.52 217.55 0 top
NOREF#472  -  []  344.58 139.06 90 top
NOREF#473  -  []  354.62 215.28 0 top
NOREF#474  -  []  331.24 258.13 0 top
NOREF#475  -  []  306.35 238.43 90 top
NOREF#476  -  []  361.59 238.43 90 top
NOREF#477  -  []  264.35 236.03 0 top
NOREF#478  -  []  253.87 155.39 90 top
NOREF#479  -  []  296.73 243.63 0 top
NOREF#480  -  []  270.42 216.26 0 top
NOREF#481  -  []  275.52 212.36 90 top
NOREF#482  -  []  254.57 141.29 90 top
NOREF#483  -  []  270.72 217.23 0 top
NOREF#484  -  []  304.35 236.03 0 top
NOREF#485  -  []  351.35 206.86 90 top
NOREF#486  -  []  403.51 139.57 90 top
NOREF#487  -  []  277.57 211.06 0 top
NOREF#488  -  []  337.31 147.51 0 top
NOREF#489  -  []  385.89 140.02 0 top
NOREF#490  -  []  308.87 191.59 0 top
NOREF#491  -  []  343.27 217.55 0 top
NOREF#492  -  []  196.34 148.14 0 top
NOREF#493  -  []  309.4 219.18 0 top
NOREF#494  -  []  267.37 234.38 0 top
NOREF#495  -  []  234.62 208.78 0 top
NOREF#496  -  []  340.02 214.31 90 top
NOREF#497  -  []  310.38 211.75 90 top
NOREF#498  -  []  274.62 212.68 0 top
NOREF#499  -  []  228.22 234.38 0 top
NOREF#500  -  []  354.62 212.68 0 top
NOREF#501  -  []  306.67 180.16 0 top
NOREF#502  -  []  354.32 211.06 0 top
NOREF#503  -  []  304.47 191.59 0 top
NOREF#504  -  []  184.57 148.14 0 top
NOREF#505  -  []  274.99 165.29 0 top
NOREF#506  -  []  395.13 140.02 0 top
NOREF#507  -  []  287.7 197.63 90 top
NOREF#508  -  []  346.82 214.63 0 top
NOREF#509  -  []  268.09 149.92 0 top
NOREF#510  -  []  219.75 245.28 0 top
NOREF#511  -  []  230.38 211.75 90 top
NOREF#512  -  []  242.61 245.28 0 top
NOREF#513  -  []  319.59 243.63 0 top
NOREF#514  -  []  355.52 218.86 90 top
NOREF#515  -  []  265.84 156.84 90 top
NOREF#516  -  []  306.82 217.23 0 top
NOREF#517  -  []  276.59 248.76 90 top
NOREF#518  -  []  211.13 241.63 0 top
NOREF#519  -  []  275.52 211.06 90 top
NOREF#520  -  []  275.52 217.56 90 top
NOREF#521  -  []  255.02 140.02 90 top
NOREF#522  -  []  180.17 165.29 0 top
NOREF#523  -  []  265.47 173.31 0 top
NOREF#524  -  []  224.47 180.16 0 top
NOREF#525  -  []  235.52 218.86 90 top
NOREF#526  -  []  234.62 217.88 0 top
NOREF#527  -  []  391.53 149.92 0 top
NOREF#528  -  []  310.72 217.23 0 top
NOREF#529  -  []  355.52 209.76 90 top
NOREF#530  -  []  266.52 218.85 0 top
NOREF#531  -  []  349.08 206.56 0 top
NOREF#532  -  []  184.57 165.29 0 top
NOREF#533  -  []  258.57 148.02 0 top
NOREF#534  -  []  272.92 216.91 90 top
NOREF#535  -  []  266.67 180.16 0 top
NOREF#536  -  []  223.27 214.31 90 top
NOREF#537  -  []  226.52 215.61 90 top
NOREF#538  -  []  391.53 138.12 90 top
NOREF#539  -  []  291.24 258.13 0 top
NOREF#540  -  []  300.7 217.09 90 top
NOREF#541  -  []  235.52 217.56 90 top
NOREF#542  -  []  392.24 158.56 90 top
NOREF#543  -  []  266.82 218.53 0 top
NOREF#544  -  []  318.58 158.56 90 top
NOREF#545  -  []  274.99 148.02 0 top
NOREF#546  -  []  179.7 258.63 0 top
NOREF#547  -  []  303.15 241.63 0 top
NOREF#548  -  []  179.24 140.69 90 top
NOREF#549  -  []  329.85 156.84 90 top
NOREF#550  -  []  314.62 210.08 0 top
NOREF#551  -  []  277.87 212.68 0 top
NOREF#552  -  []  349.08 206.56 90 top
NOREF#553  -  []  263.27 216.91 90 top
NOREF#554  -  []  359.59 243.63 0 top
NOREF#555  -  []  185.7 252.63 0 top
NOREF#556  -  []  230.77 241.23 0 top
NOREF#557  -  []  258 227.33 0 top
NOREF#558  -  []  309.4 209.46 90 top
NOREF#559  -  []  232.92 216.91 90 top
NOREF#560  -  []  218.75 241.63 0 top
NOREF#561  -  []  381.59 140.02 0 top
NOREF#562  -  []  177.67 138.24 90 top
NOREF#563  -  []  348.22 234.38 0 top
NOREF#564  -  []  321.61 241.23 0 top
NOREF#565  -  []  382.69 165.29 0 top
NOREF#566  -  []  314.62 208.78 0 top
NOREF#567  -  []  344.9 245.28 0 top
NOREF#568  -  []  314.32 208.46 0 top
NOREF#569  -  []  328.7 233.63 0 top
NOREF#570  -  []  235.52 213.66 90 top
NOREF#571  -  []  266.52 215.61 90 top
NOREF#572  -  []  336.73 236.03 0 top
NOREF#573  -  []  178.82 148.14 0 top
NOREF#574  -  []  216.73 243.63 0 top
NOREF#575  -  []  313.99 241.63 0 top
NOREF#576  -  []  275.52 216.26 90 top
NOREF#577  -  []  187.77 157.29 0 top
NOREF#578  -  []  343.27 216.25 0 top
NOREF#579  -  []  339.51 165.29 0 top
NOREF#580  -  []  226.82 218.53 0 top
NOREF#581  -  []  258.57 165.29 0 top
NOREF#582  -  []  333.76 147.51 0 top
NOREF#583  -  []  311.03 206.56 0 top
NOREF#584  -  []  387.76 139.57 90 top
NOREF#585  -  []  363.81 241.23 0 top
NOREF#586  -  []  315.52 214.96 90 top
NOREF#587  -  []  274.32 217.56 0 top
NOREF#588  -  []  333.76 157.29 90 top
NOREF#589  -  []  344.58 156.84 90 top
NOREF#590  -  []  241.61 241.23 0 top
NOREF#591  -  []  266.37 241.23 0 top
NOREF#592  -  []  230.7 210.76 90 top
NOREF#593  -  []  225.47 184.21 0 top
NOREF#594  -  []  327.97 139.51 0 top
NOREF#595  -  []  378.29 148.02 0 top
NOREF#596  -  []  320.37 147.51 0 top
NOREF#597  -  []  305.47 184.74 0 top
NOREF#598  -  []  149.7 315.13 0 top
NOREF#599  -  []  253.33 241.63 0 top
NOREF#600  -  []  213.24 255.73 0 top
NOREF#601  -  []  338.75 241.63 0 top
NOREF#602  -  []  369.21 238.03 90 top
NOREF#603  -  []  346.52 215.61 90 top
NOREF#604  -  []  355.52 216.26 90 top
NOREF#605  -  []  224.14 248.93 90 top
NOREF#606  -  []  213.74 256.53 0 top
NOREF#607  -  []  283.7 204.63 90 top
NOREF#608  -  []  317.07 257.31 0 top
NOREF#609  -  []  377.36 157.84 90 top
NOREF#610  -  []  294.89 250.82 90 top
NOREF#611  -  []  332.61 155.39 90 top
NOREF#612  -  []  238.77 211.06 90 top
NOREF#613  -  []  401.98 140.07 90 top
NOREF#614  -  []  194.14 165.29 0 top
NOREF#615  -  []  191.64 167.19 0 top
NOREF#616  -  []  394.03 165.29 0 top
NOREF#617  -  []  378.29 165.29 0 top
NOREF#618  -  []  346.52 217.55 0 top
NOREF#619  -  []  319.59 236.03 0 top
NOREF#620  -  []  269.24 140.02 90 top
NOREF#621  -  []  281.61 241.23 0 top
NOREF#622  -  []  305.47 195.64 0 top
NOREF#623  -  []  255.44 157.84 90 top
NOREF#624  -  []  273.99 241.63 0 top
NOREF#625  -  []  306.82 214.63 0 top
NOREF#626  -  []  333.24 255.73 0 top
NOREF#627  -  []  344.14 248.93 90 top
NOREF#628  -  []  291.7 233.63 0 top
NOREF#629  -  []  306.52 214.31 90 top
NOREF#630  -  []  389.89 204.16 90 top
NOREF#631  -  []  230.7 212.05 90 top
NOREF#632  -  []  314.62 213.98 0 top
NOREF#633  -  []  349.4 219.18 0 top
NOREF#634  -  []  274.62 211.38 0 top
NOREF#635  -  []  344.64 249.73 90 top
NOREF#636  -  []  353.97 238.03 90 top
NOREF#637  -  []  375.79 155.39 90 top
NOREF#638  -  []  308.22 234.38 0 top
NOREF#639  -  []  188.12 140.2 90 top
NOREF#640  -  []  246.01 241.23 0 top
NOREF#641  -  []  363.46 234.38 0 top
NOREF#642  -  []  306.82 215.93 0 top
NOREF#643  -  []  351.72 216.91 0 top
NOREF#644  -  []  344.35 236.03 0 top
NOREF#645  -  []  311.72 216.91 0 top
NOREF#646  -  []  202.09 140.2 90 top
NOREF#647  -  []  343.15 241.63 0 top
NOREF#648  -  []  264.9 245.28 0 top
NOREF#649  -  []  342.99 250.83 90 top
NOREF#650  -  []  343.57 217.23 0 top
NOREF#651  -  []  317.87 137.61 90 top
NOREF#652  -  []  253.87 149.92 0 top
NOREF#653  -  []  232 218.53 90 top
NOREF#654  -  []  272.07 176.96 90 top
NOREF#655  -  []  203.7 224.63 0 top
NOREF#656  -  []  350.7 210.76 90 top
NOREF#657  -  []  215.53 241.63 0 top
NOREF#658  -  []  338.41 157.29 0 top
NOREF#659  -  []  230.72 216.58 0 top
NOREF#660  -  []  274.62 220.48 0 top
NOREF#661  -  []  272 218.53 90 top
NOREF#662  -  []  270.38 211.75 0 top
NOREF#663  -  []  346.35 238.43 90 top
NOREF#664  -  []  201.74 140.15 0 top
NOREF#665  -  []  338.41 139.51 0 top
NOREF#666  -  []  350.38 211.75 0 top
NOREF#667  -  []  324.77 147.51 0 top
NOREF#668  -  []  272.79 165.29 0 top
NOREF#669  -  []  224.35 243.63 0 top
NOREF#670  -  []  255.02 165.29 0 top
NOREF#671  -  []  336.44 258.13 0 top
NOREF#672  -  []  353.99 241.63 0 top
NOREF#673  -  []  263.57 217.23 0 top
NOREF#674  -  []  269.4 206.86 90 top
NOREF#675  -  []  226.52 216.25 0 top
NOREF#676  -  []  354.32 214.96 0 top
NOREF#677  -  []  355.52 217.56 90 top
NOREF#678  -  []  184.57 148.14 0 top
NOREF#679  -  []  230.42 216.26 0 top
NOREF#680  -  []  226.52 216.91 90 top
NOREF#681  -  []  375.79 167.19 0 top
NOREF#682  -  []  229.08 206.56 90 top
NOREF#683  -  []  263.27 216.25 0 top
NOREF#684  -  []  224.47 191.59 0 top
NOREF#685  -  []  304.14 248.93 90 top
NOREF#686  -  []  332.7 195.63 90 top
NOREF#687  -  []  193.21 140.69 90 top
NOREF#688  -  []  314.32 218.86 0 top
NOREF#689  -  []  282.61 245.28 0 top
NOREF#690  -  []  226.32 184.74 0 top
NOREF#691  -  []  305.47 184.21 0 top
NOREF#692  -  []  268.79 158.56 90 top
NOREF#693  -  []  342.71 157.29 0 top
NOREF#694  -  []  274.32 216.26 0 top
NOREF#695  -  []  289.21 238.03 90 top
NOREF#696  -  []  226.67 180.16 0 top
NOREF#697  -  []  220.7 284.63 0 top
NOREF#698  -  []  255.44 140.57 90 top
NOREF#699  -  []  220.32 214.63 0 top
NOREF#700  -  []  323.67 139.51 0 top
NOREF#701  -  []  303.27 215.61 90 top
NOREF#702  -  []  352.07 188.39 90 top
NOREF#703  -  []  353.99 241.63 0 top
NOREF#704  -  []  375.79 138.12 90 top
NOREF#705  -  []  192.79 148.14 0 top
NOREF#706  -  []  344.47 191.59 0 top
NOREF#707  -  []  343.57 215.93 0 top
NOREF#708  -  []  242.61 234.38 0 top
NOREF#709  -  []  225.47 195.64 0 top
NOREF#710  -  []  229.4 209.46 90 top
NOREF#711  -  []  323.46 234.38 0 top
NOREF#712  -  []  230.42 216.91 0 top
NOREF#713  -  []  263.27 218.85 0 top
NOREF#714  -  []  316.19 241.63 0 top
NOREF#715  -  []  191.64 138.24 90 top
NOREF#716  -  []  213.7 231.63 0 top
NOREF#717  -  []  278.54 140.07 90 top
NOREF#718  -  []  260.02 214.95 0 top
NOREF#719  -  []  177.67 150.04 0 top
NOREF#720  -  []  235.52 216.26 90 top
NOREF#721  -  []  350.7 212.05 90 top
NOREF#722  -  []  392.68 157.29 90 top
NOREF#723  -  []  346.52 216.91 90 top
NOREF#724  -  []  189.64 156.84 90 top
NOREF#725  -  []  298.75 241.63 0 top
NOREF#726  -  []  274.62 215.28 0 top
NOREF#727  -  []  268.09 138.12 90 top
NOREF#728  -  []  264.47 180.16 0 top
NOREF#729  -  []  352.02 216.58 0 top
NOREF#730  -  []  349.4 219.18 0 top
NOREF#731  -  []  344.47 180.16 0 top
NOREF#732  -  []  312.02 217.23 0 top
NOREF#733  -  []  236.19 241.63 0 top
NOREF#734  -  []  376.94 157.29 90 top
NOREF#735  -  []  398.43 165.29 0 top
NOREF#736  -  []  226.35 238.43 90 top
NOREF#737  -  []  357.87 212.68 0 top
NOREF#738  -  []  232.07 176.96 90 top
NOREF#739  -  []  324.77 165.29 0 top
NOREF#740  -  []  315.52 212.36 90 top
NOREF#741  -  []  160.22 170.73 90 top
NOREF#742  -  []  255.53 241.63 0 top
NOREF#743  -  []  346.82 215.93 0 top
NOREF#744  -  []  359.59 250.2 90 top
NOREF#745  -  []  266.52 214.31 90 top
NOREF#746  -  []  225.47 184.21 0 top
NOREF#747  -  []  299.75 245.28 0 top
NOREF#748  -  []  310.42 216.26 0 top
NOREF#749  -  []  230.38 211.75 0 top
NOREF#750  -  []  311.35 206.86 90 top
NOREF#751  -  []  382.69 148.02 0 top
NOREF#752  -  []  274.32 211.06 0 top
NOREF#753  -  []  178.37 141.42 90 top
NOREF#754  -  []  218 227.33 0 top
NOREF#755  -  []  263.97 140.02 0 top
NOREF#756  -  []  333.31 158.56 90 top
NOREF#757  -  []  343.27 218.85 0 top
NOREF#758  -  []  223.27 216.91 90 top
NOREF#759  -  []  297.28 245.28 0 top
NOREF#760  -  []  274.99 148.02 0 top
NOREF#761  -  []  327.97 157.29 0 top
NOREF#762  -  []  437.7 108.13 90 top
NOREF#763  -  []  314.32 220.16 0 top
NOREF#764  -  []  350.42 216.26 0 top
NOREF#765  -  []  306.82 218.53 0 top
NOREF#766  -  []  343.57 218.53 0 top
NOREF#767  -  []  309.08 206.56 0 top
NOREF#768  -  []  306.52 215.61 90 top
NOREF#769  -  []  220.95 241.63 0 top
NOREF#770  -  []  350.38 211.75 90 top
NOREF#771  -  []  314.32 214.96 0 top
NOREF#772  -  []  276.19 241.63 0 top
NOREF#773  -  []  248.7 233.63 0 top
NOREF#774  -  []  234.62 219.18 0 top
NOREF#775  -  []  266.35 238.43 90 top
NOREF#776  -  []  270.7 212.05 90 top
NOREF#777  -  []  293.7 231.63 0 top
NOREF#778  -  []  278.54 157.34 90 top
NOREF#779  -  []  317.57 212.36 0 top
NOREF#780  -  []  239.59 250.2 90 top
NOREF#781  -  []  355.52 208.46 90 top
NOREF#782  -  []  265.84 139.57 90 top
NOREF#783  -  []  340.7 217.09 90 top
NOREF#784  -  []  334.18 157.84 90 top
NOREF#785  -  []  223.15 241.63 0 top
NOREF#786  -  []  220.7 217.09 90 top
NOREF#787  -  []  203.61 156.84 90 top
NOREF#788  -  []  195.24 157.29 0 top
NOREF#789  -  []  270.38 211.66 0 top
NOREF#790  -  []  238.77 212.36 90 top
NOREF#791  -  []  254.89 250.82 90 top
NOREF#792  -  []  327.7 197.63 90 top
NOREF#793  -  []  343.06 139.56 90 top
NOREF#794  -  []  315.52 211.06 90 top
NOREF#795  -  []  234.62 216.58 0 top
NOREF#796  -  []  379.39 157.29 0 top
NOREF#797  -  []  235.72 204.55 0 top
NOREF#798  -  []  223.27 216.25 0 top
NOREF#799  -  []  226.52 214.95 0 top
NOREF#800  -  []  338.75 241.63 0 top
NOREF#801  -  []  345.47 173.31 0 top
NOREF#802  -  []  226.37 241.23 0 top
NOREF#803  -  []  229.08 206.56 0 top
NOREF#804  -  []  337.31 165.29 0 top
NOREF#805  -  []  268.09 167.19 0 top
NOREF#806  -  []  344.47 180.16 0 top
NOREF#807  -  []  234.62 212.68 0 top
NOREF#808  -  []  346.52 214.31 90 top
NOREF#809  -  []  272.92 216.26 90 top
NOREF#810  -  []  271.62 216.91 90 top
NOREF#811  -  []  306.37 241.23 0 top
NOREF#812  -  []  195.24 140.15 0 top
NOREF#813  -  []  309.08 206.56 90 top
NOREF#814  -  []  269.08 206.56 90 top
NOREF#815  -  []  350.72 216.58 0 top
NOREF#816  -  []  274.62 216.58 0 top
NOREF#817  -  []  392.24 141.29 90 top
NOREF#818  -  []  189.64 139.69 90 top
NOREF#819  -  []  260.95 241.63 0 top
NOREF#820  -  []  243.46 234.38 0 top
NOREF#821  -  []  396.23 165.29 0 top
NOREF#822  -  []  275.52 220.16 90 top
NOREF#823  -  []  251.13 241.63 0 top
NOREF#824  -  []  227.37 245.28 0 top
NOREF#825  -  []  295.53 241.63 0 top
NOREF#826  -  []  357.87 211.38 0 top
NOREF#827  -  []  269.24 165.29 0 top
NOREF#828  -  []  346.52 214.95 0 top
NOREF#829  -  []  222.99 250.83 90 top
NOREF#830  -  []  274.32 213.66 0 top
NOREF#831  -  []  357.07 257.31 0 top
NOREF#832  -  []  208.7 233.63 0 top
NOREF#833  -  []  346.67 191.59 0 top
NOREF#834  -  []  234.62 213.98 0 top
NOREF#835  -  []  351.02 210.46 90 top
NOREF#836  -  []  177.67 155.39 90 top
NOREF#837  -  []  233.99 241.63 0 top
NOREF#838  -  []  331.7 233.63 0 top
NOREF#839  -  []  321.59 238.43 90 top
NOREF#840  -  []  354.32 208.46 0 top
NOREF#841  -  []  334.18 140.06 90 top
NOREF#842  -  []  391.53 167.19 0 top
NOREF#843  -  []  350.42 216.91 0 top
NOREF#844  -  []  352 218.53 90 top
NOREF#845  -  []  339.51 147.51 0 top
NOREF#846  -  []  340.32 214.63 0 top
NOREF#847  -  []  306.52 214.95 0 top
NOREF#848  -  []  229.08 209.16 0 top
NOREF#849  -  []  243.81 241.23 0 top
NOREF#850  -  []  181.27 140.15 0 top
NOREF#851  -  []  386.24 140.07 90 top
NOREF#852  -  []  303.27 214.31 90 top
NOREF#853  -  []  379.39 140.02 0 top
NOREF#854  -  []  382.69 148.02 0 top
NOREF#855  -  []  270.38 211.75 90 top
NOREF#856  -  []  314.32 211.06 0 top
NOREF#857  -  []  349.4 209.46 90 top
NOREF#858  -  []  277.87 211.38 0 top
NOREF#859  -  []  360.7 144.63 90 top
NOREF#860  -  []  264.64 249.73 90 top
NOREF#861  -  []  253.74 256.53 0 top
NOREF#862  -  []  335.53 241.63 0 top
NOREF#863  -  []  322.61 234.38 0 top
NOREF#864  -  []  303.27 216.91 90 top
NOREF#865  -  []  282.61 234.38 0 top
NOREF#866  -  []  349.08 209.16 90 top
NOREF#867  -  []  271.35 206.86 90 top
NOREF#868  -  []  271.69 157.29 0 top
NOREF#869  -  []  235.52 220.16 90 top
NOREF#870  -  []  311.14 234.91 0 top
NOREF#871  -  []  234.32 220.16 0 top
NOREF#872  -  []  251.13 241.63 0 top
NOREF#873  -  []  344.47 191.59 0 top
NOREF#874  -  []  281.61 241.23 0 top
NOREF#875  -  []  354.99 245.28 0 top
NOREF#876  -  []  340.95 241.63 0 top
NOREF#877  -  []  231.62 216.91 90 top
NOREF#878  -  []  395.13 157.29 0 top
NOREF#879  -  []  263.27 214.95 0 top
NOREF#880  -  []  230.72 217.23 0 top
NOREF#881  -  []  387.76 156.84 90 top
NOREF#882  -  []  193.21 157.84 90 top
NOREF#883  -  []  265.47 195.64 0 top
NOREF#884  -  []  354.62 210.08 0 top
NOREF#885  -  []  349.14 227.66 0 top
NOREF#886  -  []  198.54 148.14 0 top
NOREF#887  -  []  312 210.08 90 top
NOREF#888  -  []  323.7 204.63 90 top
NOREF#889  -  []  198.54 148.14 0 top
NOREF#890  -  []  305.47 184.21 0 top
NOREF#891  -  []  352.02 217.23 0 top
NOREF#892  -  []  264.32 140.07 90 top
NOREF#893  -  []  275.52 209.76 90 top
NOREF#894  -  []  355.72 204.55 0 top
NOREF#895  -  []  302.99 250.83 90 top
NOREF#896  -  []  282.61 245.28 0 top
NOREF#897  -  []  229.4 219.18 0 top
NOREF#898  -  []  270.7 210.76 90 top
NOREF#899  -  []  278.19 140.02 0 top
NOREF#900  -  []  321.61 241.23 0 top
NOREF#901  -  []  266.82 215.93 0 top
NOREF#902  -  []  314.62 215.28 0 top
NOREF#903  -  []  230.38 211.66 0 top
NOREF#904  -  []  321.47 139.51 0 top
NOREF#905  -  []  340.02 214.95 0 top
NOREF#906  -  []  256.73 236.03 0 top
NOREF#907  -  []  234.32 218.86 0 top
NOREF#908  -  []  350.72 217.23 0 top
NOREF#909  -  []  317.87 167.19 0 top
NOREF#910  -  []  346.52 218.21 90 top
NOREF#911  -  []  228.87 191.59 0 top
NOREF#912  -  []  269.66 157.84 90 top
NOREF#913  -  []  362.61 245.28 0 top
NOREF#914  -  []  352.92 216.26 90 top
NOREF#915  -  []  314.62 217.88 0 top
NOREF#916  -  []  354.32 218.86 0 top
NOREF#917  -  []  309.08 209.16 90 top
NOREF#918  -  []  319.45 157.84 90 top
NOREF#919  -  []  306.52 217.55 0 top
NOREF#920  -  []  332.61 167.19 0 top
NOREF#921  -  []  183.47 140.15 0 top
NOREF#922  -  []  331.7 228.68 45 top
NOREF#923  -  []  346.37 241.23 0 top
NOREF#924  -  []  358.39 241.63 0 top
NOREF#925  -  []  351.03 206.56 0 top
NOREF#926  -  []  401.7 170.63 90 top
NOREF#927  -  []  226.67 191.59 0 top
NOREF#928  -  []  351.72 216.26 0 top
NOREF#929  -  []  356.19 241.63 0 top
NOREF#930  -  []  306.52 216.25 0 top
NOREF#931  -  []  253.7 231.63 0 top
NOREF#932  -  []  304.47 191.59 0 top
NOREF#933  -  []  254.57 158.56 90 top
NOREF#934  -  []  296.44 258.13 0 top
NOREF#935  -  []  237.07 250.71 90 top
NOREF#936  -  []  304.47 180.16 0 top
NOREF#937  -  []  372.7 195.63 90 top
NOREF#938  -  []  269.4 219.18 0 top
NOREF#939  -  []  268.09 155.39 90 top
NOREF#940  -  []  307.37 245.28 0 top
NOREF#941  -  []  343.27 215.61 90 top
NOREF#942  -  []  350.77 241.23 0 top
NOREF#943  -  []  392.68 148.02 0 top
NOREF#944  -  []  216.44 258.13 0 top
NOREF#945  -  []  312 218.53 90 top
NOREF#946  -  []  260.77 165.29 0 top
NOREF#947  -  []  259.67 140.02 0 top
NOREF#948  -  []  270.42 216.91 0 top
NOREF#949  -  []  396.23 148.02 0 top
NOREF#950  -  []  235.52 209.76 90 top
NOREF#951  -  []  546.79 295.57 0 top
NOREF#952  -  []  376.49 158.56 90 top
NOREF#953  -  []  256.44 258.13 0 top
NOREF#954  -  []  393.11 157.84 90 top
NOREF#955  -  []  231.03 206.56 0 top
NOREF#956  -  []  266.82 217.23 0 top
NOREF#957  -  []  283.46 234.38 0 top
NOREF#958  -  []  266.82 214.63 0 top
NOREF#959  -  []  310.42 216.91 0 top
NOREF#960  -  []  279.59 243.63 0 top
NOREF#961  -  []  395.7 176.63 90 top
NOREF#962  -  []  268.87 180.16 0 top
NOREF#963  -  []  314.32 212.36 0 top
NOREF#964  -  []  356.59 259.26 0 top
NOREF#965  -  []  311.03 206.56 90 top
NOREF#966  -  []  335.11 165.29 0 top
NOREF#967  -  []  318.77 211.06 90 top
NOREF#968  -  []  319.45 140.06 90 top
NOREF#969  -  []  351.03 206.56 90 top
NOREF#970  -  []  224.47 180.16 0 top
NOREF#971  -  []  256.73 243.63 0 top
NOREF#972  -  []  263.27 215.61 90 top
NOREF#973  -  []  278.77 211.06 90 top
NOREF#974  -  []  274.32 208.46 0 top
NOREF#975  -  []  283.81 241.23 0 top
NOREF#976  -  []  355.52 211.06 90 top
